# Altium PCB PCB1.PcbDoc
Units mm, origin at the board's own origin, x right, y up, seen from the top; angles counter-clockwise.
Board outline 58.17 x 24.77 mm, 2 copper layers (Top Layer, Bottom Layer); 8 components, 6 nets, 29 pads, 0 vias.
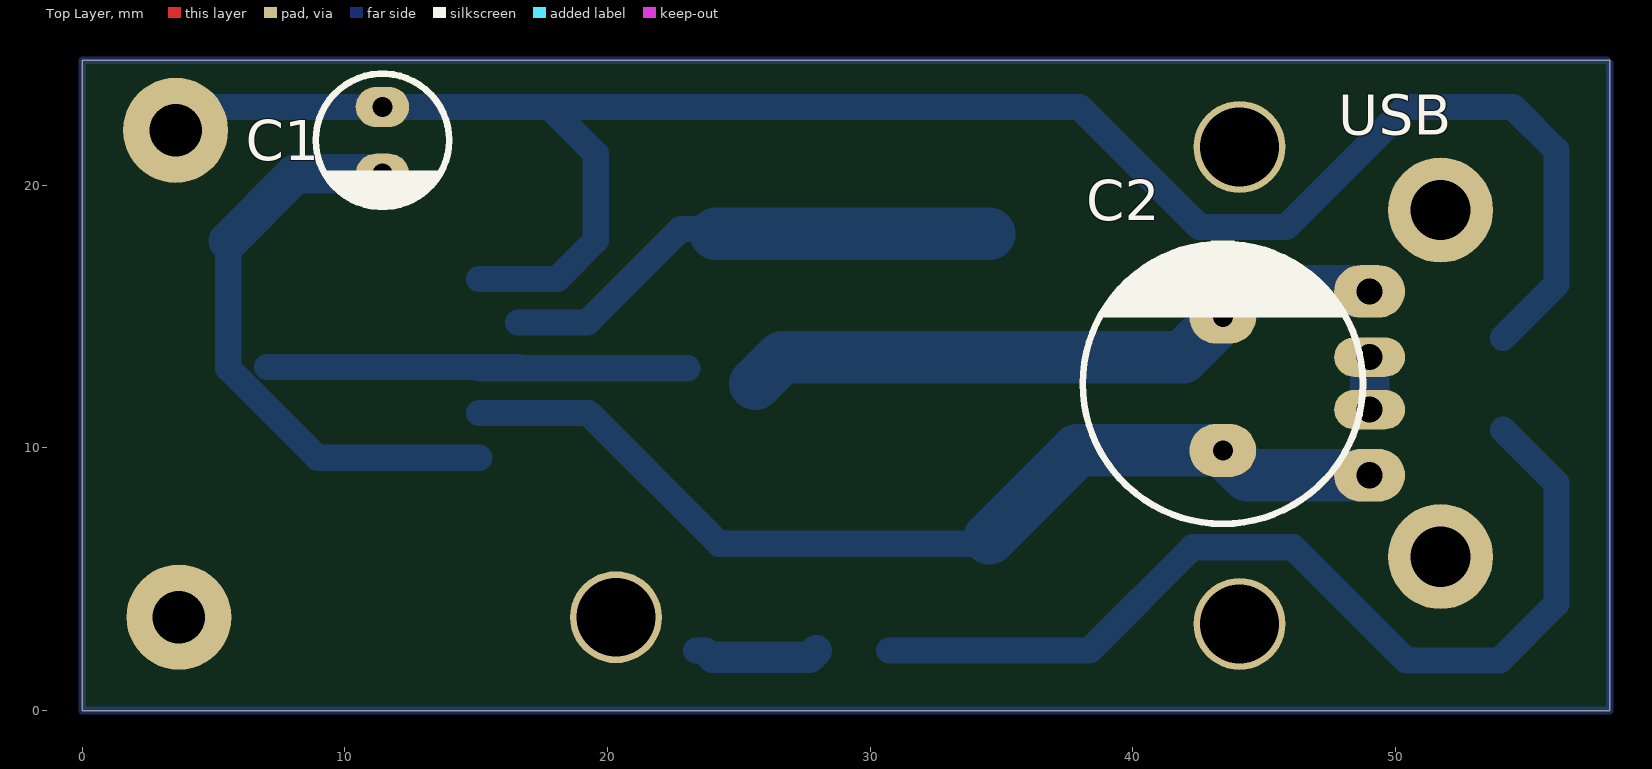
[diagram p0: Top Layer view]
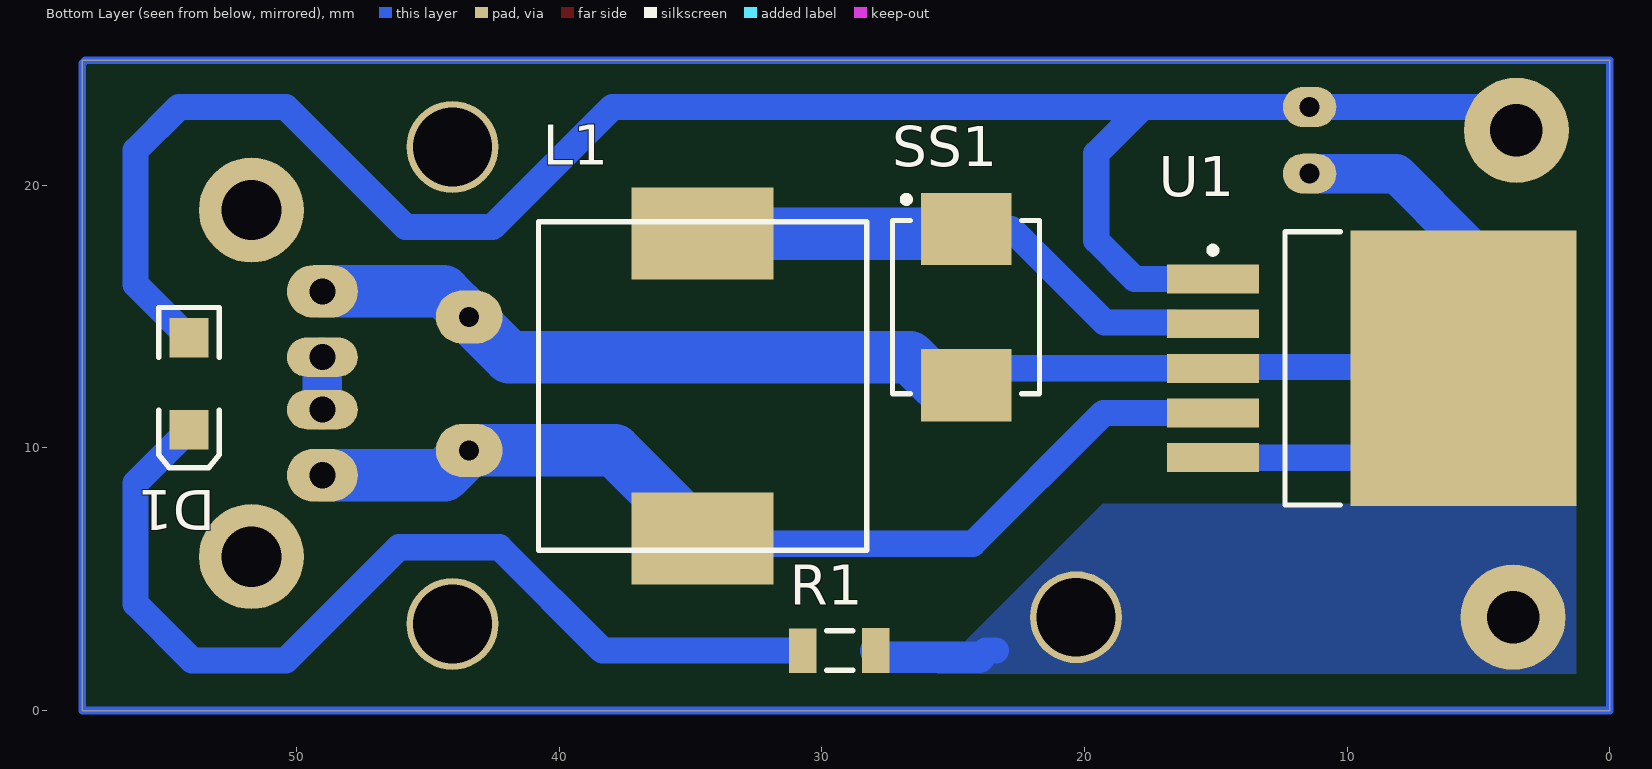
[diagram p1: Bottom Layer view, seen from below]
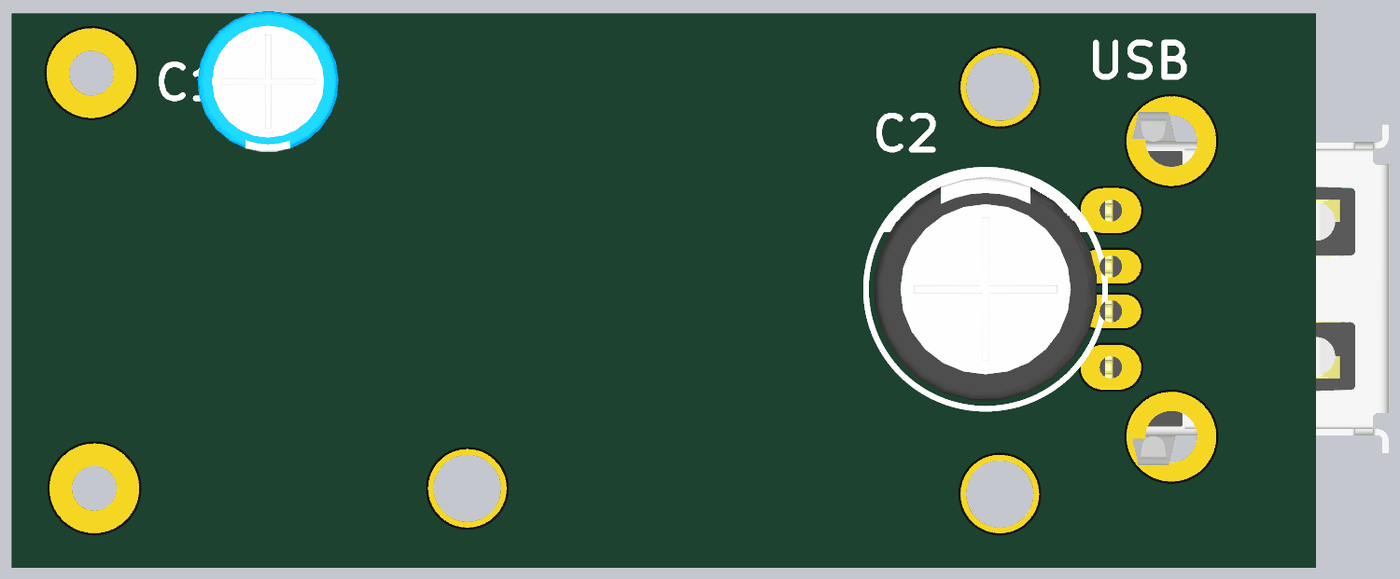
[diagram p2: 3D render of the assembled board from above, using the file's embedded part models]
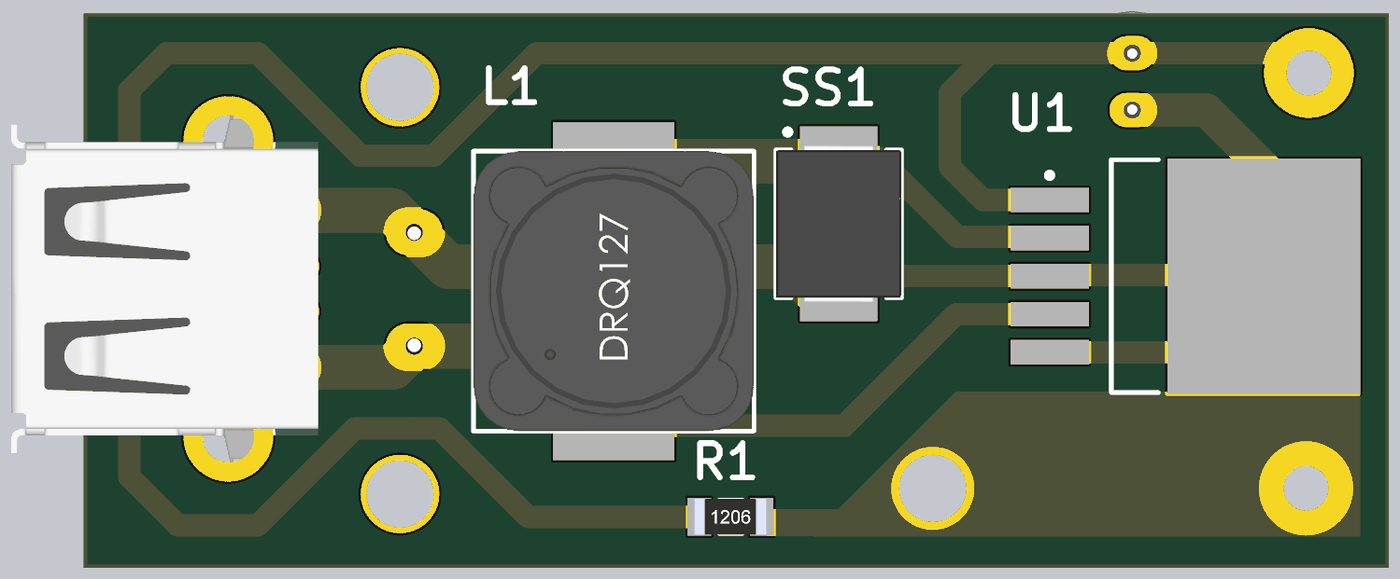
[diagram p3: 3D render of the assembled board from below, using the file's embedded part models]

## Layer stack, top to bottom
Top Solder: solder mask 0.0102, Solder Resist, Dk 3.5
Top Layer: signal copper 0.0356
Dielectric 1: dielectric 0.32, FR-4, Dk 4.8
Bottom Layer: signal copper 0.0356
Bottom Solder: solder mask 0.0102, Solder Resist, Dk 3.5

## Board outline
0,0 58.166,0 58.166,24.765 0,24.765

## Design rules (kind name [scope] priority, off if disabled: settings)
Clearance [All] p1: gap=0.254 ignorepadtopadclearanceinfootprint=FALSE except(0: Arc-Hole Track-Hole SMDPad-Hole THPad-Hole Via-Hole Fill-Hole Poly-Hole Region-Hole Text-Hole)
ComponentClearance [All] p1 off: gap=0.254 collisioncheckmode=3 verticalgap=0.254 showdistances=FALSE
PolygonConnect [All] p1: connectstyle=Direct reliefconductorwidth=0.254 reliefentries=4 polygonreliefangle="90 Angle" airgapwidth=0.254
RoomDefinition Sheet1 [InComponentClass('Sheet1')] p1 off: confinementstyle=ConfineIn formatcopy=TRUE lockcomponents=FALSE outline 66.04,1.778 106.934,1.778 106.934,21.336 66.04,21.336
RoutingVias [All] p1: holewidth=0.711 width=1.27 viastyle="Through Hole" minholewidth=0.711 minwidth=1.27 maxholewidth=0.711 maxwidth=1.27
SolderMaskExpansion [All] p1: expansion=0.102
Width [All] p1: maxlimit=10 minlimit=0.3 preferedwidth=0.5
29 further rules are at their usual default settings.

## Components (designator, comment, footprint, x,y, rotation, side; value= is the part's Value field where it differs from the comment)
C1 "100uF" ELEC-CAP-RAD10-20 11.43,21.717 r90 top
C2 "1000uF" ELEC-CAP-RAD20-40 43.434,12.446 r270 top
D1 "LED Red" LED_Red_1206 54.102,12.446 r270 bottom
L1 "330uH" RH127 40.794,18.611 r180 bottom
R1 "1K" Res_1206_SMD 29.337,2.286 r180 bottom
SS1 "SS36" SS36 24.511,15.367 r90 bottom
U1 "LM2576HVS-ADJ" TS5B_M 9.063,13.032 r180 bottom
USB "USB" "USB A-FEMALE" 49.022,12.462 r90 top locked

## Footprints (in the part's own frame and the unit in brackets; to place one, negate y for a bottom-side part, rotate by r counter-clockwise, add the part's x,y. Pads: shape width x height; smd on the part's side, far side on the other; paste and mask are expansions set on the pad)
ELEC-CAP-RAD10-20 [mil]
  oval 60x80 hole 30: 1(-50,0) 2(50,0)
  silkscreen extent -100,-100 100,100, body extent -124,-124 124,124, height 404
ELEC-CAP-RAD20-40 [mil]
  oval 80x100 hole 30: 1(-100,0) 2(100,0)
  silkscreen extent -210,-210 210,210, body extent -197,-197 197,197, height 806
LED_Red_1206 [mm]
  rect 1.5x1.5 smd: 1(-1.75,0) 2(1.75,0)
  silkscreen extent -2.9,-1.15 3.2,1.15, body extent -1.61,-0.8 1.61,0.8, height 1.1
Res_1206_SMD [mm]
  rect 1.05x1.7 smd: 1(-1.388,0) 2(1.388,0.001)
  silkscreen extent -0.49,-0.75 0.51,0.75, body extent -1.6,-0.8 1.6,0.8, height 0.54
RH127 [mm]
  rect 5.4x3.5 smd: 1(6.25,-0.45) 2(6.25,-12.05)
  silkscreen extent 0,-12.5 12.5,0, body extent 0,-12.5 12.5,0, height 8
SS36 [mm] "Molded Diode, 2-Leads"
  rect 2.75x3.45 smd: 1(-2.975,0) 2(2.975,0)
  silkscreen extent -3.3,-2.8 4.22,2.8, body extent -3.52,-2.8 3.52,2.8, height 2.06
TS5B_M [mm] "D2-PAK, 6-Leads, Body 8.6x10.2mm, Pitch 1.7mm, Lead Span 14.1mm, IPC Low Density"
  rect 3.5x1.1 smd: 1(-6.05,3.4) 2(-6.05,1.7) 3(-6.05,0) 4(-6.05,-1.7) 5(-6.05,-3.4)
  rect 8.6x10.5 smd: 6(3.5,0)
  silkscreen extent -6.18,-5.2 -1.2,5.2, body extent -3.3,-5.2 6.1,5.2, height 4.65
"USB A-FEMALE" [mm]
  oval 2x2.7 hole 1: 1(-3.5,0) 5(3.5,0)
  oval 1.5x2.7 hole 1: 2(-1,0) 3(1,0)
  round 4 hole 2.3: 6(-6.6,-2.7) 6(6.6,-2.7)
  body extent -7.9,-12.4 7.9,1.3, height 6.95

## Part data
C1 C2: library part "Capacitor Electrolytic", "Electrolytic Capacitor"
L1: library part Inductor
R1: library part Resistor
U1: "SIMPLE SWITCHER® 3A Step-Down Voltage Regulator, 5-pin TO-263", Manufacturer="National Semiconductor", PackageTopMarking="NSUZXYTTE#*LM2576*HVS-ADJ P+", PowerWise=N, Supplier Part Number 1=8207380, Code_JEDEC=MO-169-AB, ComponentLink1Description="LM2576HV Datasheet", ComponentLink1URL=http://www.national.com/ds/LM/LM2576HV.pdf, ComponentLink2Description="LM2576HV Web Page", ComponentLink2URL=http://www.national.com/pf/LM/LM2576HV.html, ComponentLink3Description="TS5B Package Page", ComponentLink3URL=http://www.national.com/packaging/folders/ts5b.html, CompType=Switcher, DatasheetVersion=Aug-2004, PackageDescription="TO-263, Molded, .400 x .390 x .180in, 5 Lead, .067in Pitch, Surface Mount", PackageReference=TS5B, PackageVersion="revD, Apr-2005", PartNumber=LM2576HVS-ADJ, PinCount=5, Published=4-Dec-2008, Publisher="Altium Limited", RoHS=N, Supplier 1=Farnell

## Free pads (board coordinates)
  round 3.5 hole 3: 1(20.32,3.556) 1(44.069,3.302) 2(44.069,21.463)
  round 4 hole 2: 7(3.556,22.098) 8(3.683,3.556)

## Nets (pads, with @x,y where several pads share a name; then routed paths per layer and width w, separated by ;. In a path a pad name is that pad's centre, name@x,y a point inside that pad or via, vN(x,y) a via of type N, cw(c..) or ccw(c..) an arc to the next point about the centre after c; other vN are vias at no path point)
GND: C1.1 C2.1 pad.1@20.32,3.556 pad.8 R1.2 SS1.1 U1.3 U1.5 U1.6 USB.5 | length 69.5
  Bottom Layer w1: U1.6@5.563,17.882 U1.6 8.963,9.632 U1.5 ; U1.6@7.041,13.081 U1.3@16.591,13.081 ; U1.3 SS1.1@23.036,13.032 ; 23.368,2.286 23.749,2.286
  Bottom Layer w1.2: 24.003,2.032 27.695,2.032 R1.2
  Bottom Layer w1.5: U1.6@5.563,17.882 8.128,20.447 C1.1
  Bottom Layer w2: SS1.1@25.635,12.446 26.651,13.462 41.91,13.462 C2.1 44.41,15.962 USB.5
NetC1_2: C1.2 D1.1 pad.7 U1.1 | length 76.2
  Bottom Layer w1: pad.7 4.953,22.987 C1.2 17.78,22.987 ; U1.1 18.083,16.432 19.558,17.907 19.558,21.209 17.78,22.987 ; D1.1 56.134,16.228 56.134,21.336 54.483,22.987 50.419,22.987 45.847,18.415 42.545,18.415 37.973,22.987 17.78,22.987
NetC2_2: C2.2 L1.2 U1.4 USB.1 | length 37.8
  Bottom Layer w1: U1.4 19.275,11.332 24.257,6.35 34.333,6.35 L1.2
  Bottom Layer w2: L1.2 37.889,9.906 C2.2 44.378,8.962 USB.1
NetD1_2: D1.2 R1.1 | length 37.2
  Bottom Layer w1: R1.1 38.354,2.286 42.291,6.223 46.101,6.223 50.419,1.905 53.975,1.905 56.134,4.064 56.134,8.664 D1.2
NetL1_1: L1.1 SS1.2 U1.2 | length 19.8
  Bottom Layer w1: U1.2@16.591,14.781 19.226,14.781 22.787,18.342 SS1.2
  Bottom Layer w2: SS1.2@24.13,18.161 L1.1
NetUSB_2: USB.2 USB.3 | length 2
  Bottom Layer w1.5: USB.2 USB.3
pads on no net: USB.6
copper on no net: | length 165.8
  Bottom Layer w0.3: 0,0 0,24.765 58.039,24.765 58.166,24.638 58.166,0 0,0

## Polygon pours and split planes (outlines as drawn)
GND on Bottom Layer "Bottom Layer-No Net" (solid, pour order 0): 1.27,7.874 1.27,1.397 25.781,1.397 19.304,7.874